# Altium PCB NewTrackerSenseBoard.PcbDoc (part 2 of 2)
Units mm, origin at the board's own origin, x right, y up, seen from the top; angles counter-clockwise.
Board outline 40 x 30 mm, 4 copper layers (L1 (SIG), L2 (GND), L3 (GND), L4 (SIG + PWR)), stack 1.566 mm thick; 46 components, 30 nets, 198 pads, 124 vias.
Unrouted connection lines stored in the file: 48.
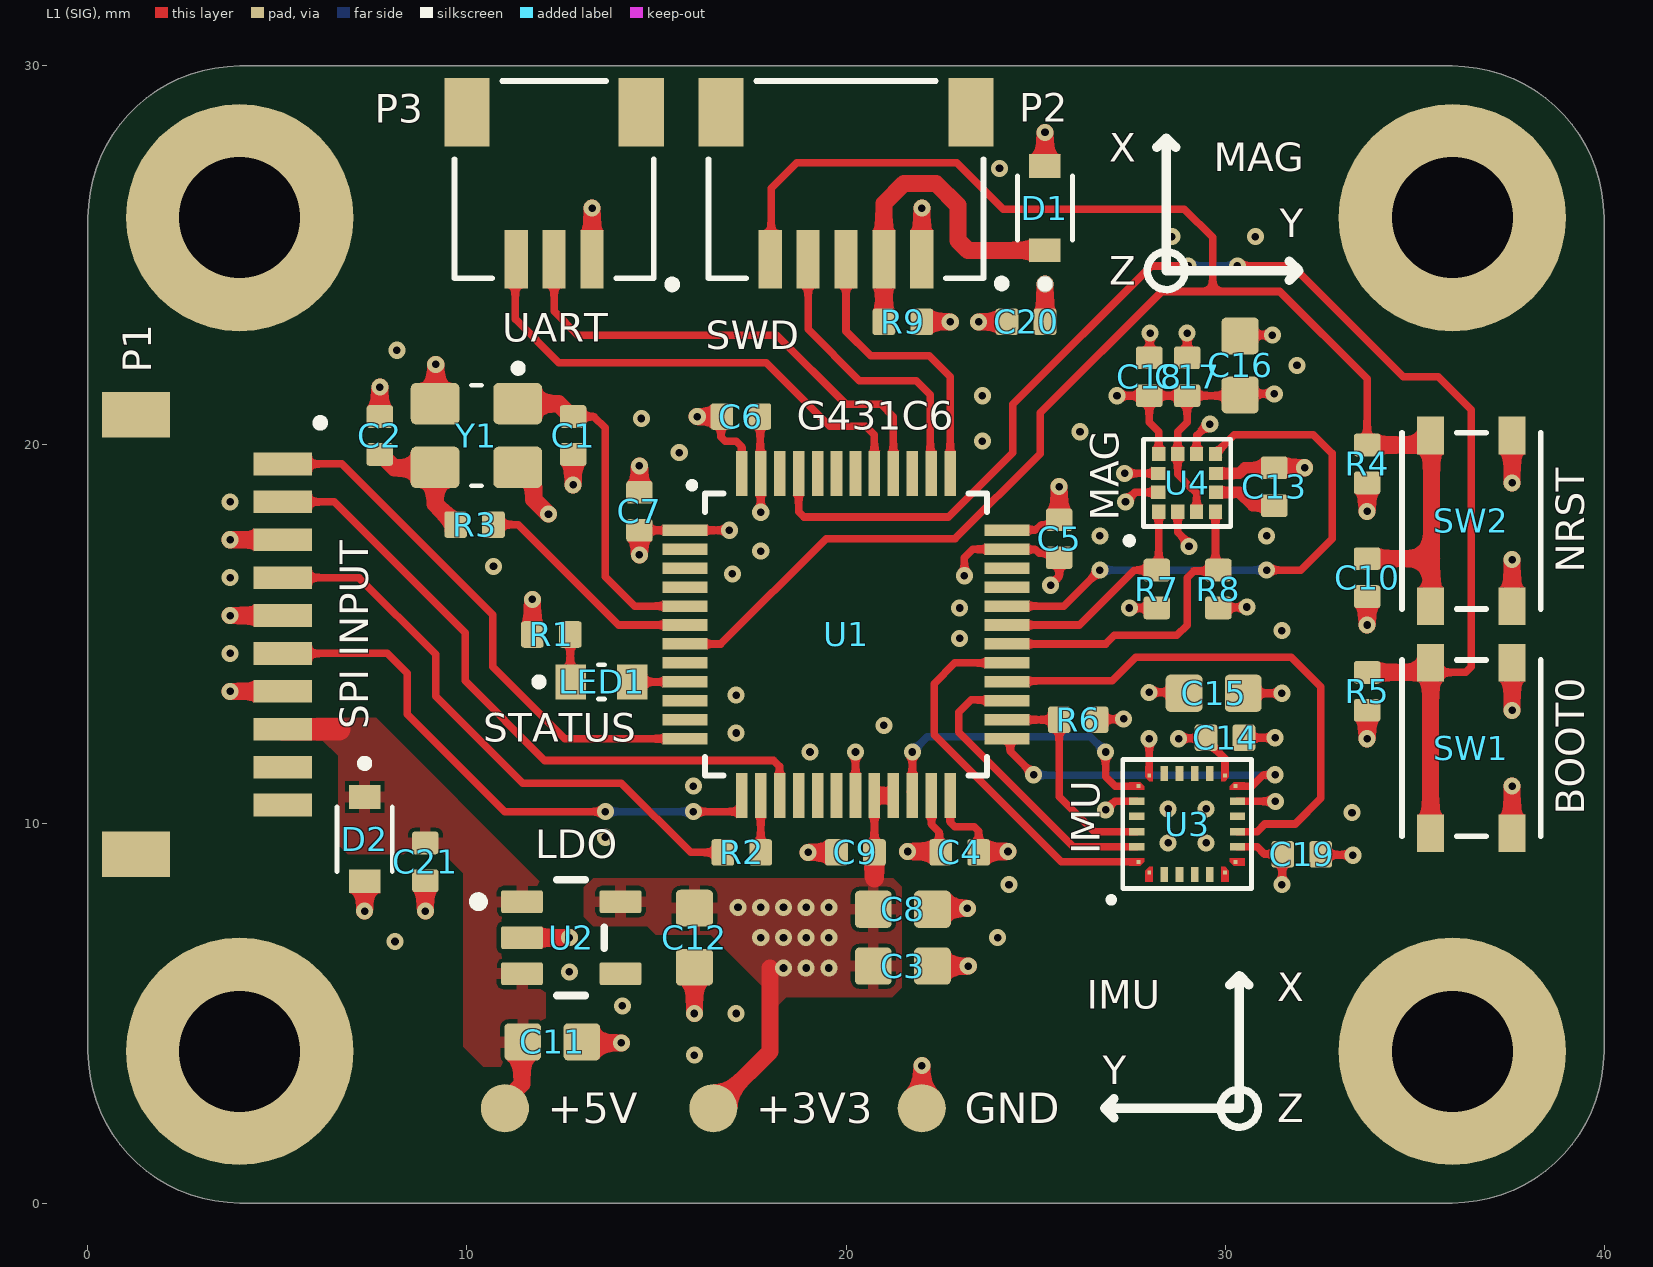
[diagram p0: L1 (SIG) view]

## Part data (continued)
R2 R3 R9: library part RCS04020000Z0ED, "0Ω Resistor, Jumper, 0402 [1005 Metric], Thick Film, 200 mW, 3 A, Surface Mount Device", Case Code (Imperial)=0402, Case Code (Metric)=1005, Manufacturer=Vishay, Max Current Rating=3A, Max Operating Temperature=155°C, Max Power Dissipation=200mW, Min Operating Temperature=-55°C, Ratings=AEC-Q200, Resistance=0Ω, Supplier Part Number 1=541-2877-6-ND, Tolerance=±5%, Voltage Rating=50V, Case/Package=0402, Category="Chip SMD Resistors", China RoHS=Non-Compliant, ComponentLink1Description=https://datasheet.octopart.com:443/RCS04020000Z0ED-Vishay-datasheet-176436275.pdf?src-supplier=IHS, ComponentLink1URL=https://datasheet.octopart.com:443/RCS04020000Z0ED-Vishay-datasheet-176436275.pdf?src-supplier=IHS, ComponentLink2Description=https://datasheet.octopart.com:443/RCS04020000Z0ED-Vishay-datasheet-86813749.pdf?src-supplier=Future+Electronics, ComponentLink2URL=https://datasheet.octopart.com:443/RCS04020000Z0ED-Vishay-datasheet-86813749.pdf?src-supplier=Future+Electronics, ComponentLink3Description=http://sigma.octopart.com:80/rohs_statement/Vishay-company-15.pdf?src-supplier=Compliance+Statements, ComponentLink3URL=http://sigma.octopart.com:80/rohs_statement/Vishay-company-15.pdf?src-supplier=Compliance+Statements, Composition="Thick Film", Country of Origin="Israel, Mainland China", Export Control Classification Number (ECCN) Code=EAR99, Features="Automotive AEC-Q200", Harmonized Tariff Schedule (HTS) Code=8533.21.00.30, Height=350µm, Introduction Date=2016-07-12, Length=1mm, Lifecycle Status=Production, Manufacturer Part Number=RCS04020000Z0ED, Mount="Surface Mount", Number of Terminals=2, Number of Terminations=2, Power Rating=200mW, Pricing 1="1=0.1, 10=0.032, 25=0.0268, 50=0.0232, 100=0.0204, 250=0.01728, 500=0.01532, 1000=0.01364, 5000=0.01064 (USD)", REACH SVHC=Yes, RoHS=Compliant, Stock 1=775160, Supplier 1=DigiKey, Voltage Rating (DC)=50V, Width=500µm
R4 R5 R6: library part CRCW040210K0FKEDHP, "10kΩ Res Thick Film 0402 10K Ohm 1% 0.2W ±100ppm/°C Molded SMD SMD Paper T/R", Case Code (Imperial)=0402, Case Code (Metric)=1005, Manufacturer=Vishay, Manufacturer Package Identifier=CRCW0402-HPe3, Max Operating Temperature=155°C, Min Operating Temperature=-55°C, Power Rating=200mW, Ratings=AEC-Q200, Resistance=10kΩ, Supplier Part Number 1=541-10.0KYDKR-ND, Temperature Coefficient=100ppm/°C, Tolerance=±1%, Voltage Rating=50V, Case/Package=0402, Category="Chip SMD Resistors", China RoHS=Non-Compliant, ComponentLink1Description=https://datasheet.octopart.com/CRCW040210K0FKEDHP-Vishay-datasheet-83567917.pdf, ComponentLink1URL=https://datasheet.octopart.com/CRCW040210K0FKEDHP-Vishay-datasheet-83567917.pdf, ComponentLink2Description=https://datasheet.octopart.com:443/CRCW040210K0FKEDHP-Vishay-datasheet-13148866.pdf?src-supplier=Newark, ComponentLink2URL=https://datasheet.octopart.com:443/CRCW040210K0FKEDHP-Vishay-datasheet-13148866.pdf?src-supplier=Newark, ComponentLink3Description=https://datasheet.octopart.com:443/CRCW040210K0FKEDHP-Vishay-datasheet-13131392.pdf?src-supplier=Newark, ComponentLink3URL=https://datasheet.octopart.com:443/CRCW040210K0FKEDHP-Vishay-datasheet-13131392.pdf?src-supplier=Newark, ComponentLink4Description=https://datasheet.octopart.com:443/CRCW040210K0FKEDHP-Vishay-datasheet-12593106.pdf?src-supplier=Newark, ComponentLink4URL=https://datasheet.octopart.com:443/CRCW040210K0FKEDHP-Vishay-datasheet-12593106.pdf?src-supplier=Newark, ComponentLink5Description=https://datasheet.octopart.com:443/CRCW040210K0FKEDHP-Vishay-datasheet-12544674.pdf?src-supplier=Newark, ComponentLink5URL=https://datasheet.octopart.com:443/CRCW040210K0FKEDHP-Vishay-datasheet-12544674.pdf?src-supplier=Newark, ComponentLink6Description=https://datasheet.octopart.com:443/CRCW040210K0FKEDHP-Vishay-datasheet-12531795.pdf?src-supplier=Newark, ComponentLink6URL=https://datasheet.octopart.com:443/CRCW040210K0FKEDHP-Vishay-datasheet-12531795.pdf?src-supplier=Newark, ComponentLink7Description=https://datasheet.octopart.com:443/CRCW040210K0FKEDHP-Vishay-datasheet-12518686.pdf?src-supplier=Newark, ComponentLink7URL=https://datasheet.octopart.com:443/CRCW040210K0FKEDHP-Vishay-datasheet-12518686.pdf?src-supplier=Newark, ComponentLink8Description=https://datasheet.octopart.com:443/CRCW040210K0FKEDHP-Vishay-datasheet-12509906.pdf?src-supplier=Newark, ComponentLink8URL=https://datasheet.octopart.com:443/CRCW040210K0FKEDHP-Vishay-datasheet-12509906.pdf?src-supplier=Newark, ComponentLink9Description=https://datasheet.octopart.com:443/CRCW040210K0FKEDHP-Vishay-datasheet-10669844.pdf?src-supplier=Newark, ComponentLink9URL=https://datasheet.octopart.com:443/CRCW040210K0FKEDHP-Vishay-datasheet-10669844.pdf?src-supplier=Newark, ComponentLink10Description=https://datasheet.octopart.com:443/CRCW040210K0FKEDHP-Vishay-datasheet-8703221.pdf?src-supplier=Newark, ComponentLink10URL=https://datasheet.octopart.com:443/CRCW040210K0FKEDHP-Vishay-datasheet-8703221.pdf?src-supplier=Newark, ComponentLink11Description=https://datasheet.octopart.com:443/CRCW040210K0FKEDHP.-Vishay-datasheet-78776210.pdf?src-supplier=Newark, ComponentLink11URL=https://datasheet.octopart.com:443/CRCW040210K0FKEDHP.-Vishay-datasheet-78776210.pdf?src-supplier=Newark, ComponentLink12Description=https://datasheet.octopart.com:443/CRCW040210K0FKEDHP-Vishay-datasheet-21268118.pdf?src-supplier=Newark, ComponentLink12URL=https://datasheet.octopart.com:443/CRCW040210K0FKEDHP-Vishay-datasheet-21268118.pdf?src-supplier=Newark, ComponentLink13Description=https://datasheet.octopart.com:443/CRCW040210K0FKEDHP-Vishay-datasheet-21226360.pdf?src-supplier=Newark, ComponentLink13URL=https://datasheet.octopart.com:443/CRCW040210K0FKEDHP-Vishay-datasheet-21226360.pdf?src-supplier=Newark, ComponentLink14Description=https://datasheet.octopart.com:443/CRCW040210K0FKEDHP-Vishay-Draloric-datasheet-8359436.pdf?src-supplier=Newark, ComponentLink14URL=https://datasheet.octopart.com:443/CRCW040210K0FKEDHP-Vishay-Draloric-datasheet-8359436.pdf?src-supplier=Newark, ComponentLink15Description=https://datasheet.octopart.com:443/CRCW040210K0FKEDHP-Vishay-datasheet-87136057.pdf?src-supplier=Farnell, ComponentLink15URL=https://datasheet.octopart.com:443/CRCW040210K0FKEDHP-Vishay-datasheet-87136057.pdf?src-supplier=Farnell, ComponentLink16Description=https://datasheet.octopart.com:443/CRCW040210K0FKEDHP-Vishay-datasheet-37143532.pdf?src-supplier=Farnell, ComponentLink16URL=https://datasheet.octopart.com:443/CRCW040210K0FKEDHP-Vishay-datasheet-37143532.pdf?src-supplier=Farnell, ComponentLink17Description=https://datasheet.octopart.com:443/CRCW040210K0FKEDHP-Vishay-datasheet-41195455.pdf?src-supplier=Farnell, ComponentLink17URL=https://datasheet.octopart.com:443/CRCW040210K0FKEDHP-Vishay-datasheet-41195455.pdf?src-supplier=Farnell, ComponentLink18Description=https://datasheet.octopart.com:443/CRCW040210K0FKEDHP.-Vishay-datasheet-66581887.pdf?src-supplier=Farnell, ComponentLink18URL=https://datasheet.octopart.com:443/CRCW040210K0FKEDHP.-Vishay-datasheet-66581887.pdf?src-supplier=Farnell, ComponentLink19Description=https://datasheet.octopart.com:443/CRCW040210K0FKEDHP-Vishay-datasheet-62317933.pdf?src-supplier=element14+APAC, ComponentLink19URL=https://datasheet.octopart.com:443/CRCW040210K0FKEDHP-Vishay-datasheet-62317933.pdf?src-supplier=element14+APAC, ComponentLink20Description=https://datasheet.octopart.com:443/CRCW040210K0FKEDHP-Vishay-Dale-datasheet-41169523.pdf?src-supplier=element14+APAC, ComponentLink20URL=https://datasheet.octopart.com:443/CRCW040210K0FKEDHP-Vishay-Dale-datasheet-41169523.pdf?src-supplier=element14+APAC, ComponentLink21Description=https://datasheet.octopart.com:443/CRCW040210K0FKEDHP-Vishay-datasheet-192322387.pdf?src-supplier=HQonline, ComponentLink21URL=https://datasheet.octopart.com:443/CRCW040210K0FKEDHP-Vishay-datasheet-192322387.pdf?src-supplier=HQonline, ComponentLink22Description=https://datasheet.octopart.com:443/CRCW040210K0FKEDHP-Vishay-datasheet-62316122.pdf?src-supplier=Future+Electronics, ComponentLink22URL=https://datasheet.octopart.com:443/CRCW040210K0FKEDHP-Vishay-datasheet-62316122.pdf?src-supplier=Future+Electronics, ComponentLink23Description=https://datasheet.octopart.com:443/CRCW040210K0FKEDHP-Vishay-Dale-datasheet-47688881.pdf?src-supplier=RS+(Formerly+Allied+Electronics), ComponentLink23URL=https://datasheet.octopart.com:443/CRCW040210K0FKEDHP-Vishay-Dale-datasheet-47688881.pdf?src-supplier=RS+(Formerly+Allied+Electronics), ComponentLink24Description=https://datasheet.octopart.com:443/CRCW040210K0FKEDHP-Vishay-datasheet-11548710.pdf?src-supplier=Arrow+Electronics, ComponentLink24URL=https://datasheet.octopart.com:443/CRCW040210K0FKEDHP-Vishay-datasheet-11548710.pdf?src-supplier=Arrow+Electronics, ComponentLink25Description=http://sigma.octopart.com:80/rohs_statement/Vishay-company-15.pdf?src-supplier=Compliance+Statements, ComponentLink25URL=http://sigma.octopart.com:80/rohs_statement/Vishay-company-15.pdf?src-supplier=Compliance+Statements, Composition="Thick Film", Contact Plating=Tin, Country of Origin="Israel, Mainland China", Depth=500µm, Export Control Classification Number (ECCN) Code=EAR99, Harmonized Tariff Schedule (HTS) Code=8533.21.00.30, Height=300µm, Introduction Date=2008-07-29, Lead Free="Lead Free", Length=1mm, Lifecycle Status=Production, Manufacturer Part Number=CRCW040210K0FKEDHP, Military Standard=Not, Mount="Surface Mount", Number of Pins=2, Number of Terminals=2, Packaging="Cut Tape", Pricing 1="1=0.12, 10=0.057, 25=0.0436, 50=0.0362, 100=0.0303, 250=0.02452, 500=0.02122, 1000=0.0186, 5000=0.01445 (USD)", Radiation Hardening=No, REACH SVHC=Yes, RoHS=Compliant, Schedule B=8533210045, Stock 1=168325, Supplier 1=DigiKey, Termination=SMD/SMT, Voltage Rating (DC)=50V, Weight=652.039032µg, Width=500µm, Working Voltage=50V
R7 R8: library part RCS04023K30FKED, "3.3kΩ 1% 0.2W(1/5W) ±100ppm/C Conformal Coated Pad SMD Automotive Medical T/R", Case/Package=0402, Manufacturer=Vishay, Max Operating Temperature=155°C, Max Power Dissipation=200mW, Min Operating Temperature=-55°C, Ratings=AEC-Q200, Resistance=3.3kΩ, Supplier Part Number 1=541-10408-6-ND, Temperature Coefficient=100ppm/°C, Tolerance=±1%, Working Voltage=50V, Category="Chip SMD Resistors", China RoHS=Non-Compliant, ComponentLink1Description=https://datasheet.octopart.com:443/RCS04023K30FKED-Vishay-datasheet-176436275.pdf?src-supplier=IHS, ComponentLink1URL=https://datasheet.octopart.com:443/RCS04023K30FKED-Vishay-datasheet-176436275.pdf?src-supplier=IHS, ComponentLink2Description=https://datasheet.octopart.com:443/RCS04023K30FKED-Vishay-datasheet-86813749.pdf?src-supplier=Future+Electronics, ComponentLink2URL=https://datasheet.octopart.com:443/RCS04023K30FKED-Vishay-datasheet-86813749.pdf?src-supplier=Future+Electronics, ComponentLink3Description=http://sigma.octopart.com:80/rohs_statement/Vishay-company-15.pdf?src-supplier=Compliance+Statements, ComponentLink3URL=http://sigma.octopart.com:80/rohs_statement/Vishay-company-15.pdf?src-supplier=Compliance+Statements, Composition="Thick Film", Country of Origin="Israel, Mainland China", Export Control Classification Number (ECCN) Code=EAR99, Features="Automotive AEC-Q200", Harmonized Tariff Schedule (HTS) Code=8533.21.00.30, Height=350µm, Introduction Date=2016-07-12, Length=1mm, Lifecycle Status=Production, Manufacturer Part Number=RCS04023K30FKED, Mount="Surface Mount", Number of Terminals=2, Number of Terminations=2, Power Rating=200mW, Pricing 1="1=0.13, 10=0.06, 25=0.046, 50=0.0382, 100=0.0321, 250=0.02604, 500=0.02258, 1000=0.01984, 5000=0.01549 (USD)", REACH SVHC=Yes, RoHS=Compliant, Schedule B=8533210045|8533210045|8533210045|8533210045|8533210045, Stock 1=10761, Supplier 1=DigiKey, Width=500µm
SW1 SW2: library part PTS810SJM250SMTRLFS, "Switch Tactile N.O. SPST Button J-Bend 0.05A 16V 150000Cycles 1.569N SMD T/R", Case/Package=SMD/SMT, Color=Black, Contact Current Rating=50mA, Contact Resistance=500mΩ, Insulation Resistance=100MΩ, Manufacturer="C&K Components", Max Operating Temperature=85°C, Max Voltage Rating (DC)=16V, Min Operating Temperature=-40°C, Operating Force=1.57N, Actuator Length=711.2µm, Category="Tactile Switches", ComponentLink1Description=https://datasheet.octopart.com:443/PTS810SJM250SMTRLFS-C%26K-Components-datasheet-180017475.pdf?src-supplier=IHS, ComponentLink1URL=https://datasheet.octopart.com:443/PTS810SJM250SMTRLFS-C%26K-Components-datasheet-180017475.pdf?src-supplier=IHS, ComponentLink2Description=https://datasheet.octopart.com:443/PTS810SJM250SMTRLFS-C%26K-Components-datasheet-67873722.pdf?src-supplier=Upverter, ComponentLink2URL=https://datasheet.octopart.com:443/PTS810SJM250SMTRLFS-C%26K-Components-datasheet-67873722.pdf?src-supplier=Upverter, ComponentLink3Description=https://datasheet.octopart.com:443/PTS810-SJM-250-SMTR-LFS-C%26K-Components-datasheet-41562126.pdf?src-supplier=Upverter, ComponentLink3URL=https://datasheet.octopart.com:443/PTS810-SJM-250-SMTR-LFS-C%26K-Components-datasheet-41562126.pdf?src-supplier=Upverter, ComponentLink4Description=https://datasheet.octopart.com:443/PTS810SJM250SMTR-LFS-C%26K-Components-datasheet-181955281.pdf?src-supplier=Farnell, ComponentLink4URL=https://datasheet.octopart.com:443/PTS810SJM250SMTR-LFS-C%26K-Components-datasheet-181955281.pdf?src-supplier=Farnell, ComponentLink5Description=https://datasheet.octopart.com:443/PTS810SJM250SMTRLFS-C%26K-Components-datasheet-134606748.pdf?src-supplier=TME, ComponentLink5URL=https://datasheet.octopart.com:443/PTS810SJM250SMTRLFS-C%26K-Components-datasheet-134606748.pdf?src-supplier=TME, ComponentLink6Description=https://datasheet.octopart.com:443/PTS810-SJM-250-SMTR-LFS-C%26K-Components-datasheet-151508687.pdf?src-supplier=TME, ComponentLink6URL=https://datasheet.octopart.com:443/PTS810-SJM-250-SMTR-LFS-C%26K-Components-datasheet-151508687.pdf?src-supplier=TME, ComponentLink7Description=http://sigma.octopart.com:80/reach_statement/ITT-company-18.pdf?src-supplier=Compliance+Statements, ComponentLink7URL=http://sigma.octopart.com:80/reach_statement/ITT-company-18.pdf?src-supplier=Compliance+Statements, Contact Plating=Silver, Country of Origin="Mainland China", Current Rating=50mA, Depth=4.6mm, Electrical Life=150kcycles, Export Control Classification Number (ECCN) Code=EAR99, Harmonized Tariff Schedule (HTS) Code=8536.50.90.40, Height=1.8mm, Illumination Type=Non-Illuminated, Introduction Date=2013-03-04, Lead Free="Lead Free", Length=4.2mm, Life (Cycles)=150kcycles, Lifecycle Status=Production, Manufacturer Package Identifier=PTS810SJM250SMTRLFS, Manufacturer Part Number=PTS810SJM250SMTRLFS, Max Current Rating=50mA, Mechanical Life=150kcycles, Mount="Surface Mount", Number of Pins=4, Number of Positions=1, Orientation=Straight, Pricing 1="1=0.58, 10=0.501, 25=0.4672, 100=0.4173, 250=0.38652, 500=0.36488, 1000=0.34488 (USD)", REACH SVHC=Yes, RoHS=Compliant, Stock 1=70955, Supplier 1=DigiKey, Switch Function=Off-Mom, Switch Travel=150µm, Termination=Solder, Throw Configuration=SPST, Voltage Rating (DC)=16V
U1: "Microcontroller 32-Bit ARM Cortex-M4 RISC 32K-Byte Flash 3.3V 48-Pin LQFP", Case/Package=LFQFP, Frequency=170MHz, Manufacturer=STMicroelectronics, Max Frequency=48MHz, Max Operating Temperature=85°C, Max Supply Current=29mA, Max Supply Voltage=3.6V, Min Operating Temperature=-40°C, Min Supply Voltage=1.71V, Nominal Supply Voltage (DC)=3V, ADC Channels (Resolution)="17-Ch 12-Bit", Category=Microcontrollers, China RoHS=Compliant, ComponentLink1Description=https://datasheet.octopart.com:443/STM32G431C6T6-STMicroelectronics-datasheet-159144895.pdf?src-supplier=Newark, ComponentLink1URL=https://datasheet.octopart.com:443/STM32G431C6T6-STMicroelectronics-datasheet-159144895.pdf?src-supplier=Newark, ComponentLink2Description=https://datasheet.octopart.com:443/STM32G431C6T6-STMicroelectronics-datasheet-144618855.pdf?src-supplier=TME, ComponentLink2URL=https://datasheet.octopart.com:443/STM32G431C6T6-STMicroelectronics-datasheet-144618855.pdf?src-supplier=TME, Core Architecture="ARM Cortex-M4", Country of Origin="Mainland China, Taiwan", DAC Channels (Resolution)="4-Ch 12-Bit", EEPROM Memory Size=0B, Export Control Classification Number (ECCN) Code=3A991.A.2, Flash Memory Size=32kB, Harmonized Tariff Schedule (HTS) Code=8542.31.00.25, Height - Seated (Max)=1.6mm, Interface=USB, Introduction Date=2019-10-29, Length=7mm, Lifecycle Status=Production, Manufacturer Part Number=STM32G431C6T6, Memory Type=FLASH, Number of A/D Converters=2, Number of Channels=17, Number of D/A Converters=2, Number of I2C Channels=3, Number of I/Os=5, Number of Interrupts=16, Number of SPI Channels=3, Number of Terminals=48, Number of Timers/Counters=12, Number of USART Channels=3, Peripherals=POR, Pricing 1="1500=2.29 (USD)", RAM Size=32kB, REACH SVHC=Yes, RoHS=Compliant, Schedule B="8542310000, 8542310000|8542310000|8542310000|8542310000|8542310000", Stock 1=1500, Supplier 1="Future Electronics", Supplier Part Number 1=STM32G431C6T6, Terminal Pitch=500µm, Width=7mm
U2: "300mA ultra-low-noise low-IQ low-dropout (LDO) linear regulator with high PSRR 5-SOT-23 -40 to 125", Case/Package=SOT-23-5, Dropout Voltage=145mV, Manufacturer="Texas Instruments", Manufacturer Lifecycle Status=ACTIVE, Max Junction Temperature (Tj)=125°C, Max Supply Voltage=6V, Min Operating Temperature=-40°C, Min Supply Voltage=1.6V, Nominal Supply Current=6.5µA, Output Current=300mA, Output Voltage=3.3V, Supplier Part Number 1=296-TPS7A2033PDBVRDKR-ND, Accuracy=1.5%, Category="LDO Voltage Regulators", ComponentLink1Description=https://sigma.octopart.com:443/177332311/technical_drawing/Texas-Instruments-TPS7A2033PDBVR.pdf?src-supplier=Texas+Instruments, ComponentLink1URL=https://sigma.octopart.com:443/177332311/technical_drawing/Texas-Instruments-TPS7A2033PDBVR.pdf?src-supplier=Texas+Instruments, ComponentLink2Description=https://octopart.com:443/opatz8j6/c1?t=jI4MJxUHNHWPLUTUjPFE_I4nFT9ogQQS70wFg6iEODFO8LbYHvqBDKPBMlDtEwO4fNGI88ubVwCkCjf0m79oYyvw0lNgXSr_kQlB_nshs-lDL0gpQEt062WpfwVbrY7aMcaNfk_VYcVu1c5ZyMHT8tYLznoJcMs0V3cIKOpV8FkTUbmZxBhaArT7MSQXB5rB175PQ9HeqkODOBcAb5uxQ4pXmdIRVFW0nHjT5bbTxbLCkHYQ6wSbjOTmjpzrmMdRq376bhW5SzS0L0ZYTijf2l1mplZ7KrrI9CUmQvcyMNcVPe6befGlNnr1fDH3Q5Ss6aSm6FD-UpaqOnEuIpR4XaVo6xK0ksEziWk1rzqOuekfSo_fNioOtoDqTgyhaxobMR58zb0N&src-supplier=Texas+Instruments, ComponentLink2URL=https://octopart.com:443/opatz8j6/c1?t=jI4MJxUHNHWPLUTUjPFE_I4nFT9ogQQS70wFg6iEODFO8LbYHvqBDKPBMlDtEwO4fNGI88ubVwCkCjf0m79oYyvw0lNgXSr_kQlB_nshs-lDL0gpQEt062WpfwVbrY7aMcaNfk_VYcVu1c5ZyMHT8tYLznoJcMs0V3cIKOpV8FkTUbmZxBhaArT7MSQXB5rB175PQ9HeqkODOBcAb5uxQ4pXmdIRVFW0nHjT5bbTxbLCkHYQ6wSbjOTmjpzrmMdRq376bhW5SzS0L0ZYTijf2l1mplZ7KrrI9CUmQvcyMNcVPe6befGlNnr1fDH3Q5Ss6aSm6FD-UpaqOnEuIpR4XaVo6xK0ksEziWk1rzqOuekfSo_fNioOtoDqTgyhaxobMR58zb0N&src-supplier=Texas+Instruments, ComponentLink3Description=https://sigma.octopart.com:443/175570406/technical_drawing/Texas-Instruments-TPS7A2033PDBVR.pdf?src-supplier=Texas+Instruments, ComponentLink3URL=https://sigma.octopart.com:443/175570406/technical_drawing/Texas-Instruments-TPS7A2033PDBVR.pdf?src-supplier=Texas+Instruments, ComponentLink4Description=https://sigma.octopart.com:443/169406034/technical_drawing/Texas-Instruments-TPS7A2033PDBVR.pdf?src-supplier=Texas+Instruments, ComponentLink4URL=https://sigma.octopart.com:443/169406034/technical_drawing/Texas-Instruments-TPS7A2033PDBVR.pdf?src-supplier=Texas+Instruments, ComponentLink5Description=https://sigma.octopart.com:443/155939316/technical_drawing/Texas-Instruments-TPS7A2033PDBVR.pdf?src-supplier=Texas+Instruments, ComponentLink5URL=https://sigma.octopart.com:443/155939316/technical_drawing/Texas-Instruments-TPS7A2033PDBVR.pdf?src-supplier=Texas+Instruments, ComponentLink6Description=https://datasheet.octopart.com:443/TPS7A2033PDBVR-Texas-Instruments-datasheet-149070019.pdf?src-supplier=Upverter, ComponentLink6URL=https://datasheet.octopart.com:443/TPS7A2033PDBVR-Texas-Instruments-datasheet-149070019.pdf?src-supplier=Upverter, ComponentLink7Description=https://datasheet.octopart.com:443/TPS7A2033PDBVR-Texas-Instruments-datasheet-164420832.pdf?src-supplier=Augswan, ComponentLink7URL=https://datasheet.octopart.com:443/TPS7A2033PDBVR-Texas-Instruments-datasheet-164420832.pdf?src-supplier=Augswan, ComponentLink8Description=https://datasheet.octopart.com:443/TPS7A2033PDBVR-Texas-Instruments-datasheet-159781690.pdf?src-supplier=LCSC, ComponentLink8URL=https://datasheet.octopart.com:443/TPS7A2033PDBVR-Texas-Instruments-datasheet-159781690.pdf?src-supplier=LCSC, ComponentLink9Description=http://sigma.octopart.com:80/reach_statement/Texas-Instruments-company-64.pdf?src-supplier=Compliance+Statements, ComponentLink9URL=http://sigma.octopart.com:80/reach_statement/Texas-Instruments-company-64.pdf?src-supplier=Compliance+Statements, ComponentLink10Description=http://sigma.octopart.com:80/conflict_mineral_statement/Texas-Instruments-company-63.pdf?src-supplier=Compliance+Statements, ComponentLink10URL=http://sigma.octopart.com:80/conflict_mineral_statement/Texas-Instruments-company-63.pdf?src-supplier=Compliance+Statements, Height=1.45mm, Length=2.9mm, Lifecycle Status=Production, Manufacturer Part Number=TPS7A2033PDBVR, Max Operating Temperature=125°C, Number of Channels=1, Number of Outputs=1, Number of Pins=5, Pricing 1="1=0.33, 10=0.225, 25=0.1992, 100=0.1715, 250=0.15828, 500=0.15028, 1000=0.14369 (USD)", RoHS=Compliant, Stock 1=57995, Supplier 1=DigiKey, Thickness=1.2mm, Width=1.6mm
U3: "IMU (Inertial Measurement Unit), 6-Axis, Accelerometer, Gyroscope", Manufacturer=TDK, Manufacturer Lifecycle Status=PRODUCTION, Supplier Part Number 1=1428-ICM-40609-DTR-ND, Category=Sensors, ComponentLink1Description=https://datasheet.octopart.com:443/ICM-40609-D-TDK-datasheet-168053012.pdf?src-supplier=TDK, ComponentLink1URL=https://datasheet.octopart.com:443/ICM-40609-D-TDK-datasheet-168053012.pdf?src-supplier=TDK, ComponentLink2Description=https://datasheet.octopart.com:443/ICM-40609-D-TDK-datasheet-178640640.pdf?src-supplier=Farnell, ComponentLink2URL=https://datasheet.octopart.com:443/ICM-40609-D-TDK-datasheet-178640640.pdf?src-supplier=Farnell, Introduction Date=2023-02-15, Length=3mm, Lifecycle Status=Production, Manufacturer Part Number=ICM-40609-D, Pricing 1="5000=3.0875 (USD)", REACH SVHC=Yes, RoHS=Compliant, Stock 1=4348, Supplier 1=DigiKey, Width=3mm
U4: "IIS2MDC Series 3.6 V Ultra-Low-Power 3-axis Digital Magnetic Sensor - LGA-12", Manufacturer=STMicroelectronics, Manufacturer Package Identifier=LGA-12-DM00170568, Max Operating Temperature=85°C, Max Supply Voltage=3.6V, Min Operating Temperature=-40°C, Min Supply Voltage=1.71V, Operating Supply Voltage=2.5V, Temperature Grade=Industrial, Axis="X, Y, Z", Category="Hall Effect Sensors", China RoHS=Compliant, ComponentLink1Description=https://datasheet.octopart.com:443/IIS2MDCTR-STMicroelectronics-datasheet-101965392.pdf?src-supplier=element14+APAC, ComponentLink1URL=https://datasheet.octopart.com:443/IIS2MDCTR-STMicroelectronics-datasheet-101965392.pdf?src-supplier=element14+APAC, Height=700µm, Height - Seated (Max)=700µm, Length=2mm, Lifecycle Status=Production, Manufacturer Part Number=IIS2MDCTR, Number of Circuits=1, Number of Terminals=12, Output Type=Digital, Packaging="Cut Tape", Pricing 1="1=3.25, 5=2.9, 10=2.77, 25=2.6136, 50=2.507, 100=2.4091, 500=2.21248, 1000=2.13927, 5000=1.99179 (USD)", REACH SVHC=Yes, RoHS=Compliant, Schedule B="8542390000, 8542390000|8542390000|8542390000|8542390000|8542390000", Sensing Method=Magnetoresistive, Stock 1=4818, Supplier 1=DigiKey, Terminal Pitch=500µm, Width=2mm
Y1: library part "TSX-3225 24.0000MF15X-AC3", "Crystal 24MHz ±10ppm (Tol) ±15ppm (Stability) 9pF FUND 40Ohm 4-Pin Mini-CSMD T/R", Case/Package=SMD/SMT, ESR (Equivalent Series Resistance)=40Ω, Frequency=24MHz, Frequency Stability=15ppm, Frequency Tolerance=0.001%, Load Capacitance=9pF, Manufacturer=Epson, Max Operating Temperature=85°C, Min Operating Temperature=-40°C, Category=Crystals, China RoHS=Compliant, ComponentLink1Description=https://datasheet.octopart.com:443/TSX-3225-24.0000MF15X-AC3-Epson-datasheet-61114919.pdf?src-supplier=ODG+(Origin+Data+Global), ComponentLink1URL=https://datasheet.octopart.com:443/TSX-3225-24.0000MF15X-AC3-Epson-datasheet-61114919.pdf?src-supplier=ODG+(Origin+Data+Global), ComponentLink2Description=https://datasheet.octopart.com:443/TSX-322524.0000MF15X-AC3-Epson-datasheet-180707711.pdf?src-supplier=IHS, ComponentLink2URL=https://datasheet.octopart.com:443/TSX-322524.0000MF15X-AC3-Epson-datasheet-180707711.pdf?src-supplier=IHS, ComponentLink3Description=https://datasheet.octopart.com:443/TSX-3225-24.0000MF15X-AC3-Epson-datasheet-141944207.pdf?src-supplier=Arrow.cn, ComponentLink3URL=https://datasheet.octopart.com:443/TSX-3225-24.0000MF15X-AC3-Epson-datasheet-141944207.pdf?src-supplier=Arrow.cn, ComponentLink4Description=http://sigma.octopart.com:80/149135495/reach_statement/Epson-TSX-3225-24.0000MF15X-AC3.pdf?src-supplier=Compliance+Statements, ComponentLink4URL=http://sigma.octopart.com:80/149135495/reach_statement/Epson-TSX-3225-24.0000MF15X-AC3.pdf?src-supplier=Compliance+Statements, ComponentLink5Description=http://sigma.octopart.com:80/149135496/rohs_statement/Epson-TSX-3225-24.0000MF15X-AC3.pdf?src-supplier=Compliance+Statements, ComponentLink5URL=http://sigma.octopart.com:80/149135496/rohs_statement/Epson-TSX-3225-24.0000MF15X-AC3.pdf?src-supplier=Compliance+Statements, Height=609.6µm, Lead Free="Lead Free", Length=3.2004mm, Lifecycle Status=Production, Manufacturer Part Number="TSX-3225 24.0000MF15X-AC3", Mount="Surface Mount", Pricing 1="1=0.82, 10=0.714, 25=0.6748, 50=0.647, 100=0.6202 (USD)", REACH SVHC=Yes, RoHS=Compliant, Schedule B="8541600060, 8541600060|8541600060|8541600060|8541600060|8541600060", Series Resistance=40Ω, Stock 1=44842, Supplier 1=DigiKey, Termination=SMD/SMT, Tolerance=0.001%, Weight=15.989131mg, Width=2.4892mm

## Free pads (board coordinates)
  round 6 hole 3.2 mask+0.051: 1(4,4) 2(36,4) 3(36,26) 4(4,26)

## Via types
v1: diameter 0.45, hole 0.2, L1 (SIG) to L4 (SIG + PWR), tented both sides, 124 vias

## Nets (pads, with @x,y where several pads share a name; then routed paths per layer and width w, separated by ;. In a path a pad name is that pad's centre, name@x,y a point inside that pad or via, vN(x,y) a via of type N, cw(c..) or ccw(c..) an arc to the next point about the centre after c; other vN are vias at no path point)
+3V3: +3V3.1 C3.2 C4.2 C5.2 C6.2 C7.2 C8.2 C9.2 C12.2 C14.2 C15.2 C16.2 C17.2 C18.2 C19.2 C20.2 R4.2 R6.2 R7.2 R8.2 R9.1 SW1.1 SW1.2 U1.1 U1.20 U1.21 U1.24 U1.36 U1.48 U2.5 U3.8 U3.13 U4.3 U4.9 U4.10 | length 38.6
  L1 (SIG) w0.2: C7.2 U1.1 v1(16.925,17.75) ; C6.2@16.675,20.75 16.7,20.725 16.7,20.217 16.817,20.1 17.1,20.1 17.25,19.95 U1.48 U1.48@17.198,19.302 ; C9.2 U1.20@20.75,10.625 ; U1.24 22.75,10.042 22.867,9.925 23.383,9.925 23.5,9.808 C4.2 C4.2@23.537,9.287 ; U1.36 24.262,17.762 25.012,17.762 25.135,17.885 25.535,17.885 C5.2@25.625,17.975 ; R6.2 26.638,12.763 27.313,12.763 v1(27.325,12.775) ; v1(27.15,21.3) C18.2 ; v1(27.475,15.7) R7.2 ; v1(28,13.475) 28.895,13.475 C15.2 ; U4.10 28.25,20.35 28,20.6 C18.2 ; v1(28.775,12.25) 28.788,12.263 29.487,12.263 C14.2 ; U4.3 29.262,18.237 29.275,18.25 29.25,18.275 29.25,18.733 29.133,18.85 29.125,18.85 28.75,19.225 U4.9 28.75,20.35 29,20.6 C17.2 ; C14.2@29.5,12.225 30,11.725 30,11.375 ; R8.2 29.838,15.712 30.562,15.712 v1(30.575,15.725) ; C16.2@30.25,21.32 30.23,21.3 C17.2 ; U3.8 30.489,9.4 30.85,9.4 31.042,9.208 31.517,9.208 C19.2 31.525,9.075 31.512,9.062 31.512,8.412 v1(31.5,8.4) ; C16.2@30.385,21.31 30.425,21.35 v1(31.3,21.35) ; C18.2 C17.2
  L1 (SIG) w0.45: v1(14.55,17.1) C7.2@14.55,17.675 ; C12.2@15.735,7.95 15.8,7.885 15.8,7.85 15.87,7.78 C12.2 ; v1(16.075,20.75) C6.2@16.675,20.75 ; +3V3.1@16.834,2.834 18,4 18,6.2 ; C3.2@20.475,6.275 20.575,6.375 20.7,6.25 C3.2 ; C8.2 C8.2@20.75,7.78 ; U1.20@20.85,10.75 U1.21@21.15,10.75 ; R9.1 v1(22.75,23.25) ; v1(23.5,23.25) C20.2 ; C4.2@23.537,9.287 23.55,9.275 v1(24.275,9.275) ; C5.2 v1(25.625,18.9) ; v1(33.75,18.25) R4.2 ; SW1.2 v1(37.575,11) ; v1(37.575,13) SW1.1
  L1 (SIG) w0.5: 20.75,8.575 C9.2
  other v1: 18.35,6.2 18.95,6.2 19.55,6.2 17.75,7 18.35,7 18.95,7 19.55,7 17.15,7.8 17.75,7.8 18.35,7.8 18.95,7.8 19.55,7.8
+5V: +5V.1 C11.2 C21.2 D2.K P1.8 U2.1 U2.3 | length 3.4
  L1 (SIG) w0.45: +5V.1 11,2.692 11.45,3.142 11.45,4.23 C11.2
  L1 (SIG) w0.6: P1.8 6.625,12.5
BOOT0: R5.2 SW1.3 SW1.4 U1.45 | length 38.1
  L1 (SIG) w0.2: U1.45 18.75,18.242 18.892,18.1 22.703,18.1 24.4,19.797 24.4,21.075 28.048,24.723 v1(29.027,24.723) ; v1(30.325,24.725) 31.775,24.725 34.7,21.8 35.625,21.8 36.5,20.925 36.5,14.15 36.35,14 35.675,14 SW1.3
  L1 (SIG) w0.45: R5.2 35.294,14 SW1.3@35.425,14.131 ; SW1.4 SW1.3@35.425,14.131 ; SW1.3 SW1.3@35.425,14.131
  L4 (SIG + PWR) w0.2: v1(29.027,24.723) 29.028,24.724 v1(30.325,24.725) v1(30.325,24.725)
GND: C1.1 C2.2 C3.1 C4.1 C5.1 C6.1 C7.1 C8.1 C9.1 C10.1 C11.1 C12.1 C13.1 C14.1 C15.1 C16.1 C17.1 C18.1 C19.1 C20.1 C21.1 D1.A D2.A GND.1 P1.3 P1.5 P1.7 P2.1 P3.1 pad.1 pad.2 pad.3 pad.4 R1.1 R5.1 SW2.3 SW2.4 U1.19 U1.23 U1.35 U1.47 U2.2 U3.11 U3.18 U3.20 U4.2 U4.6 U4.8 U4.11 U4.12 Y1.2 Y1.4 | length 52.5
  L1 (SIG) w0.2: R1.1 R1.1@11.725,15.1 ; C6.1 17.738,20.737 17.738,19.287 17.75,19.275 U1.47 v1(17.75,18.225) ; C6.1@17.75,20.5 C6.1@17.917,20.667 ; U1.19 v1(20.25,11.9) ; U1.23 22.258,10.742 22.258,9.984 22.459,9.783 22.459,9.291 C4.1 ; v1(23.125,16.55) 23.125,17.025 23.35,17.25 U1.35 24.262,17.238 25.012,17.238 25.1,17.15 25.45,17.15 C5.1@25.625,16.975 ; v1(25.4,16.3) 25.4,16.308 25.625,16.533 C5.1@25.625,16.975 ; C5.1 C5.1@25.625,16.975 ; v1(26.85,10.375) 26.867,10.375 27.092,10.6 U3.20 ; v1(27.35,19.25) U4.11 ; v1(27.375,18.5) 27.625,18.75 U4.12 ; 28,11.375 v1(28,12.25) ; C18.1 28.012,22.313 28.012,22.937 v1(28.025,22.95) ; U4.2 28.75,17.693 29.05,17.393 v1(29.05,17.325) ; C17.1@28.988,22.363 29,22.35 C17.1 ; C17.1@29,22.375 v1(29,22.95) ; U4.8 29.25,20.25 29.55,20.55 v1(29.6,20.55) ; U3.11 31.324,10.6 v1(31.327,10.597) ; C16.1@30.4,22.9 v1(31.25,22.9) ; C15.1 v1(31.5,13.45) ; C14.1 v1(31.325,12.275) ; C19.1 32.525,9.175 32.538,9.188 33.362,9.188 v1(33.375,9.175)
  L1 (SIG) w0.3: U4.6 30.375,19.25 30.525,19.4 C13.1
  L1 (SIG) w0.45: v1(3.75,13.5) 5.25,13.5 P1.7 ; v1(3.75,15.5) 5,15.5 P1.5 ; v1(3.75,17.5) P1.3@5,17.5 ; P1.3@5,17.5 P1.3 ; v1(7.3,7.7) D2.A ; C2.2 v1(7.7,21.525) ; v1(8.9,7.7) C21.1 ; Y1.2@9.16,20.99 9.16,21.16 9.175,21.175 v1(9.175,22.125) ; Y1.4@11.34,19.31 11.54,19.31 11.76,19.09 11.76,18.565 v1(12.15,18.175) ; U2.2 v1(12.7,7) ; R1.1@11.725,15.1 v1(11.725,15.925) ; v1(12.8,18.95) C1.1 ; C11.1 13.03,4.03 13.225,4.225 v1(14.075,4.225) ; P3.1 v1(13.3,26.25) ; C7.1 v1(14.55,19.45) ; v1(16,5) 16,6 C12.1 ; v1(19,9.25) C9.1 ; v1(21.625,9.275) 22.443,9.275 C4.1@22.459,9.291 ; GND.1 v1(22,3.625) ; P2.1 22,25 v1(22,26.25) ; C3.1 22.35,6.25 v1(23.225,6.25) ; C8.1 22.3,7.75 22.325,7.775 v1(23.2,7.775) ; C20.1 v1(25.25,24.25) ; D1.A 25.25,27.5 v1(25.25,28.25) ; C17.1@28.988,22.363 C17.1@29,22.375 ; C16.1@30.25,22.88 30.38,22.88 C16.1@30.4,22.9 ; C13.1 v1(32.1,19.4) ; v1(33.75,12.25) R5.1 ; v1(33.75,15.25) C10.1 ; SW2.3 v1(37.575,16.975) ; v1(37.575,19) SW2.4
  other v1: 16,3.9 17.1,5 14.1,5.2 12.7,6.1 8.1,6.9 24,7 24.3,8.4 28.5,9.5 29.5,9.5 13.65,9.65 33.35,10.3 28.5,10.4 29.5,10.4 15.975,11 19.05,11.9 17.1,12.4 21,12.6 17.1,13.4 3.75,14.5 23,14.9 31.5,15.1 23,15.7 3.75,16.5 17,16.6 10.7,16.8 17.75,17.2 26.7,17.6 31.1,17.6 3.75,18.5 15.6,19.8 23.6,20.1 26.175,20.35 14.6,20.7 23.6,21.3 31.9,22.1 8.15,22.5 28.6,25.5 30.8,25.5 24.05,27.3
I2C2_SCL: R7.1 U1.31 U4.1 | length 6.1
  L1 (SIG) w0.2: U1.31 26.15,15.25 27.6,16.7 R7.1 28.25,16.75 U4.1
I2C2_SDA: R8.1 U1.30 U4.4 | length 8.5
  L1 (SIG) w0.2: U1.30 26.85,14.75 27.075,14.975 28.725,14.975 29,15.25 29,16.5 29.175,16.675 29.675,16.675 29.75,16.75 U4.4
IMU_INT1: U1.25 U3.12 | length 8.8
  L1 (SIG) w0.2: U1.25 24.302,12.198 24.335,12.198 24.335,11.915 v1(24.95,11.3) ; U3.12 30.7,11 30.991,11.291 31.316,11.291 v1(31.325,11.3)
  L4 (SIG + PWR) w0.2: v1(24.95,11.3) 24.959,11.291 31.316,11.291 v1(31.325,11.3)
IMU_INT2: U1.22 U3.19 | length 8.2
  L1 (SIG) w0.2: U1.22 21.75,10.8 21.7,10.85 21.75,10.9 v1(21.75,11.9) ; v1(26.85,11.9) 26.85,11.25 27.1,11 U3.19
  L4 (SIG + PWR) w0.2: v1(21.75,11.9) 22.15,12.3 26.45,12.3 v1(26.85,11.9)
MAG_INT: U1.32 U4.7 | length 15.1
  L1 (SIG) w0.2: U1.32 25.75,15.75 v1(26.7,16.7) ; U4.7 29.75,19.775 30.25,20.275 32.325,20.275 32.825,19.775 32.825,17.525 32,16.7 v1(31.1,16.7)
  L4 (SIG + PWR) w0.2: v1(26.7,16.7) v1(31.1,16.7)
NetC13_2: C13.2 U4.5 | length 1.7
  L1 (SIG) w0.3: U4.5 30.375,18.75 30.725,18.4 C13.2
NRST: C10.2 P2.5 R4.1 SW2.1 SW2.2 U1.7 | length 49.2
  L1 (SIG) w0.2: U1.7 16.7,14.75 19.475,17.525 22.875,17.525 25.125,19.775 25.125,20.85 28.325,24.05 29.675,24.05 ; P2.5 18,25.175 18.025,25.2 18.025,26.775 18.7,27.45 22.925,27.45 24.15,26.225 28.925,26.225 29.675,25.475 29.675,24.05 ; R4.1 33.75,21.75 31.45,24.05 29.675,24.05
  L1 (SIG) w0.45: C10.2 35.45,17 ; R4.1 35.294,20 SW2.2@35.425,20.131 ; SW2.1 35.45,15.775 35.45,17 ; SW2.2 35.45,20.225 35.45,17
OSC: C2.1 R3.1 Y1.3 | length 3.4
  L1 (SIG) w0.45: C2.1 7.7,19.7 7.8,19.7 7.825,19.675 7.825,19.659 8.089,19.395 Y1.3@9.16,19.395 ; Y1.3 Y1.3@9.16,19.395 ; Y1.3@9.175,19.395 Y1.3@9.16,19.395 ; R3.1 9.7,17.95 9.625,18.025 9.575,18.025 9.16,18.44 Y1.3@9.16,19.395
OSC_IN: C1.2 U1.5 Y1.1 | length 9.1
  L1 (SIG) w0.2: C1.2 13.35,20.75 13.65,20.45 13.65,16.525 14.425,15.75 U1.5
  L1 (SIG) w0.45: Y1.1@11.456,20.974 Y1.1 12.411,21.09 12.675,20.826 12.675,20.825 12.75,20.75 C1.2
OSC_OUT: R3.2 U1.6 | length 6.1
  L1 (SIG) w0.2: R3.2 11.35,17.9 14,15.25 U1.6
S_LED: LED1.A U1.9 | length 1.5
  L1 (SIG) w0.2: LED1.A U1.9@15.9,13.75
S_LED1: LED1.C R1.2 | length 1.3
  L1 (SIG) w0.2: R1.2 12.725,14.075 12.7,14.05 12.74,14.01 LED1.C
SPI1_MISO: R2.2 U1.14 | length 1.5
  L1 (SIG) w0.2: R2.2 U1.14
SPI1_MISO2: P1.4 R2.1 | length 15.3
  L1 (SIG) w0.2: P1.4 5.8,16.5 7.15,16.5 9.175,14.475 9.175,13.375 11.475,11.075 14.075,11.075 15.9,9.25 R2.1
SPI1_MOSI: P1.2 U1.15 | length 17.5
  L1 (SIG) w0.2: P1.2 5.25,18.5 6.5,18.5 9.95,15.05 9.95,13.775 12.05,11.675 18.088,11.675 18.245,11.518 18.245,10.755 U1.15
SPI1_NSS: P1.1 U1.12 | length 14.4
  L1 (SIG) w0.2: P1.1@5.25,19.5 6.7,19.5 10.675,15.525 10.675,14.15 12.575,12.25 U1.12
  L1 (SIG) w0.45: P1.1 P1.1@5.25,19.5
SPI1_SCK: P1.6 U1.13 | length 14.9
  L1 (SIG) w0.102: U1.13@17.148,10.325 17.25,10.427 U1.13
  L1 (SIG) w0.2: P1.6 5.2,14.5 5.25,14.45 5.3,14.5 7.9,14.5 8.425,13.975 8.425,12.9 11,10.325 v1(13.65,10.325) ; v1(15.975,10.325) U1.13@17.148,10.325
  L4 (SIG + PWR) w0.2: v1(13.65,10.325) v1(15.975,10.325)
SPI2_MISO: U1.28 U3.9 | length 14.4
  L1 (SIG) w0.2: U1.28 24.625,13.75 24.65,13.725 24.7,13.775 27.025,13.775 27.65,14.4 31.75,14.4 32.525,13.625 32.525,10.675 31.85,10 31.05,10 30.85,9.8 U3.9
SPI2_MOSI: U1.29 U3.24 | length 10.3
  L1 (SIG) w0.2: U1.29 24,14.25 23.975,14.275 23.95,14.25 22.875,14.25 22.325,13.7 22.325,12.35 25.675,9 U3.24
SPI2_NSS: R6.1 U1.26 U3.22 | length 5.7
  L1 (SIG) w0.2: U1.26 U1.26@24.325,12.75 ; U1.26@24.425,12.75 R6.1 25.625,10.725 26.55,9.8 U3.22
SPI2_SCK: U1.27 U3.23 | length 7.9
  L1 (SIG) w0.2: U1.27 24.1,13.25 24.075,13.275 23.3,13.275 22.975,12.95 22.975,12.422 25.997,9.4 U3.23
SWCLK: P2.4 U1.38 | length 7.9
  L1 (SIG) w0.2: P2.4 19,23.05 20.35,21.7 21.85,21.7 22.225,21.325 22.225,19.475 22.25,19.45 U1.38
SWDIO: P2.3 U1.37 | length 7.7
  L1 (SIG) w0.2: P2.3 20,23 20.65,22.35 22.2,22.35 22.75,21.8 U1.37
UART_RX: P3.3 U1.41 | length 13.3
  L1 (SIG) w0.2: P3.3 11.3,24.8 11.275,24.775 11.275,23.325 12.425,22.175 17.9,22.175 19.575,20.5 20.525,20.5 20.75,20.275 U1.41
UART_TX: P3.2 U1.40 | length 13
  L1 (SIG) w0.2: P3.2 12.3,23.525 12.925,22.9 18.175,22.9 20,21.075 20.925,21.075 21.25,20.75 21.25,19.425 21.275,19.4 21.25,19.375 U1.40
VSENSE: D1.K P2.2 R9.2 | length 8.9
  L1 (SIG) w0.2: R9.2 R9.2@21,23.3
  L1 (SIG) w0.45: R9.2@21,23.3 P2.2 21,26.375 21.525,26.9 22.375,26.9 22.95,26.325 22.95,25.401 23.214,25.137 25.06,25.137 25.1,25.178 25.1,25.2 25.163,25.137 D1.K
pads on no net: P1.9 P1.10 P1.P-MOUNT1 P1.P-MOUNT2 P2.P-MOUNT1 P2.P-MOUNT2 P3.P-MOUNT1 P3.P-MOUNT2 U1.2 U1.3 U1.4 U1.8 U1.10 U1.11 U1.16 U1.17 U1.18 U1.33 U1.34 U1.39 U1.42 U1.43 U1.44 U1.46 U2.4 U3.1 U3.2 U3.3 U3.4 U3.5 U3.6 U3.7 U3.10 U3.14 U3.15 U3.16 U3.17 U3.21

## Polygon pours and split planes (outlines as drawn)
+5V on L1 (SIG) "NONET_L-01_P-001" (solid, pour order 1): 7.6,12.8 6.2,12.8 4.3,12.8 4.3,12.2 6.2,12.2 6.6,11.8 6.6,9.45 6.85,9.2 9.4,9.2 9.9,8.7 9.9,4.125 10.425,3.6 12,3.6 12.075,3.675 12.075,8.325 11.9,8.5
+3V3 on L1 (SIG) "NONET_L-01_P-001" (solid, pour order 0): 14.975,7.075 14.75,7.3 13.325,7.3 13.075,7.55 13.075,8.325 13.325,8.575 21.25,8.575 21.475,8.35 21.475,5.675 21.225,5.425 18.425,5.425 18.1,5.1 18,5.1 17.825,5.275 17.825,5.675 16.425,7.075
GND on L2 (GND) "NONET_L-01_P-001" (solid, remove dead copper, pour order 2): 0,0 0,30 40,30 40,0
GND on L3 (GND) "NONET_L-01_P-001" (solid, remove dead copper, pour order 3): 0,0 0,30 40,30 40,0
+3V3 on L4 (SIG + PWR) "NONET_L-01_P-001" (solid, pour order 4): 0,0 0,30 40,30 40,0

## Silkscreen, mask and mechanical layers (free items; w line width, h text height)
Top Overlay:
  circle w0.2: c30.379,2.502 r0.5
  circle w0.2: c28.45,24.6 r0.5
  lines w0.25: 27.072,2.25 26.821,2.5 ; 27.072,2.75 26.821,2.5 ; 28.2,27.85 28.45,28.1 ; 30.129,5.752 30.379,6.002 ; 30.629,5.752 30.379,6.002 ; 31.7,24.35 31.95,24.6 ; 31.7,24.85 31.95,24.6 ; 26.821,2.5 30.379,2.5 30.379,6.002 ; 28.45,28.1 28.7,27.85 ; 28.45,28.1 28.45,24.6 31.95,24.6 ; 28.7,27.85 28.7,27.85
  text "X" at 26.95,27.475 h0.75
  text "MAG" at 29.7,27.225 h0.75
  text "Y" at 31.45,25.475 h0.75
  text "Z" at 26.95,24.225 h0.75
  text "UART" at 10.925,22.725 h0.75
  text "SWD" at 16.3,22.525 h0.75
  text "G431C6" at 18.7,20.4 h0.75
  text "MAG" at 27.2,18 h0.75 r90
  text "NRST" at 39.475,16.625 h0.75 r90
  text "SPI INPUT" at 7.4,12.5 h0.75 r90
  text "STATUS" at 10.425,12.175 h0.75
  text "BOOT0" at 39.475,10.251 h0.75 r90
  text "IMU" at 26.7,9.2 h0.75 r90
  text "LDO" at 11.8,9.1 h0.75
  text "X" at 31.379,5.327 h0.75
  text "IMU" at 26.354,5.127 h0.75
  text "Y" at 26.779,3.127 h0.75
  text "Z" at 31.379,2.127 h0.75
Bottom Overlay:
  text "P1" at 15.466,26.7 h1
  text "P3" at 20.633,26.7 h1
  text "P2" at 25.633,26.7 h1
  text "1" at 11.95,24.75 h0.9
  text "CSN" at 16,24.75 h0.9
  text "GND" at 21,24.75 h0.9
  text "GND" at 26,24.75 h0.9
  text "MOSI" at 16.3,23.25 h0.9
  text "TX" at 20.55,23.25 h0.9
  text "VCC" at 26,23.25 h0.9
  text "GND" at 16,21.75 h0.9
  text "RX" at 20.55,21.75 h0.9
  text "SWDIO" at 26.824,21.75 h0.9
  text "RET" at 16,20.25 h0.9
  text "SWCLK" at 26.899,20.25 h0.9
  text "RST" at 26,18.75 h0.9
  text "GND" at 17.153,18.496 h0.9
  text "SCK" at 16,17.25 h0.9
  text "GND" at 16,15.75 h0.9
  text "+5V" at 16,14.25 h0.9
  text "10" at 12.225,12.75 h0.9
  text "+VBAT" at 17.399,12.75 h0.9
  text "UQ Biorobot" at 28.544,8.338 h1.52
  text "IMU Driver" at 27.783,6.338 h1.52
  text "Rev 1.0" at 23.966,4.6 h1
Mechanical 13:
  the board outline again, w0.2